# Altium PCB Flyback Converter.PcbDoc
Units mil, origin at the board's own origin, x right, y up, seen from the top; angles counter-clockwise.
Board outline 4900.03 x 2810.03 mil, 2 copper layers (Top Layer, Bottom Layer); 53 components, 29 nets, 118 pads, 10 vias.
Unrouted connection lines stored in the file: 9.
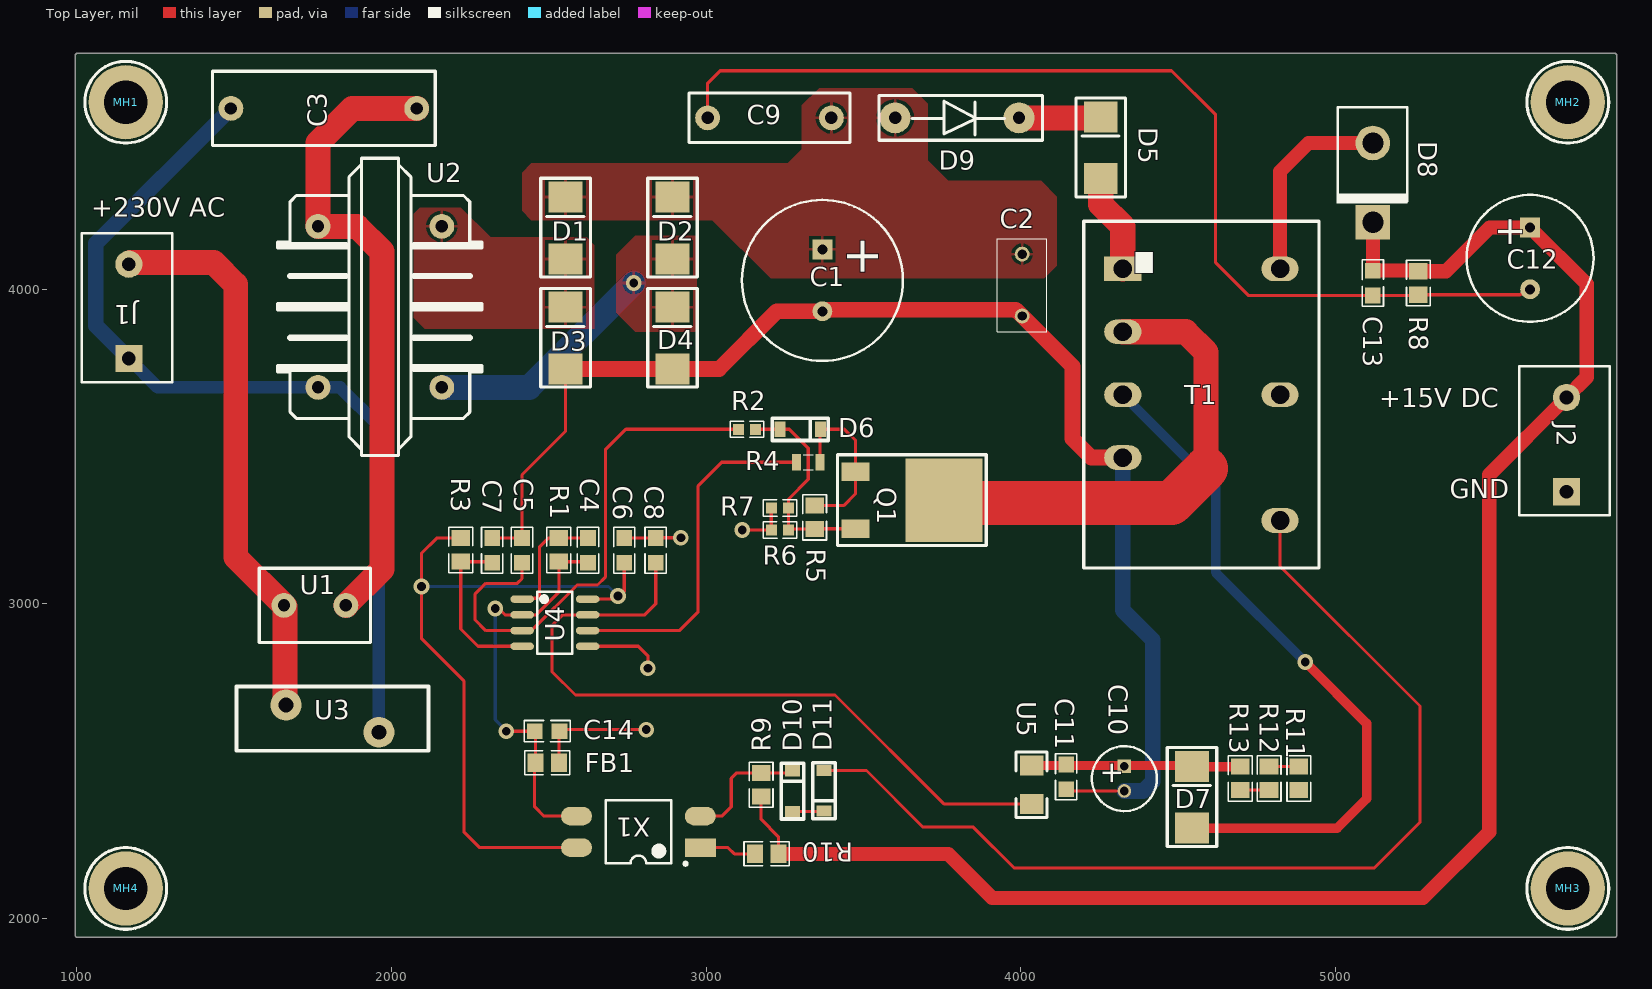
[diagram p0: Top Layer view]
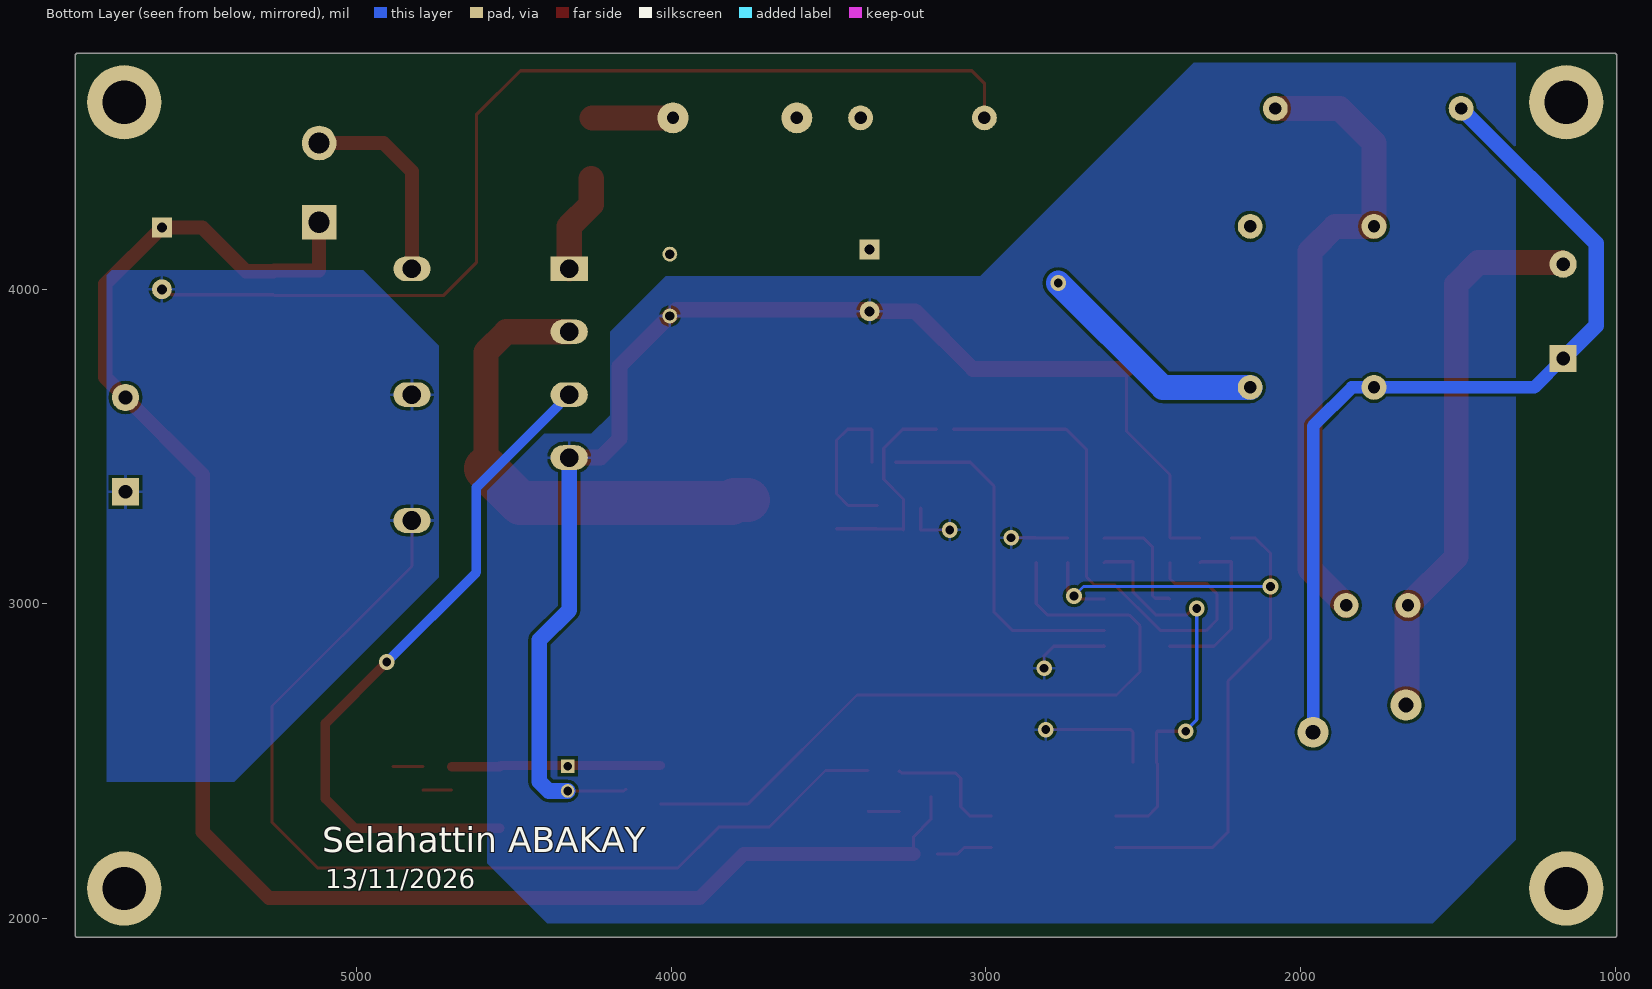
[diagram p1: Bottom Layer view, seen from below]
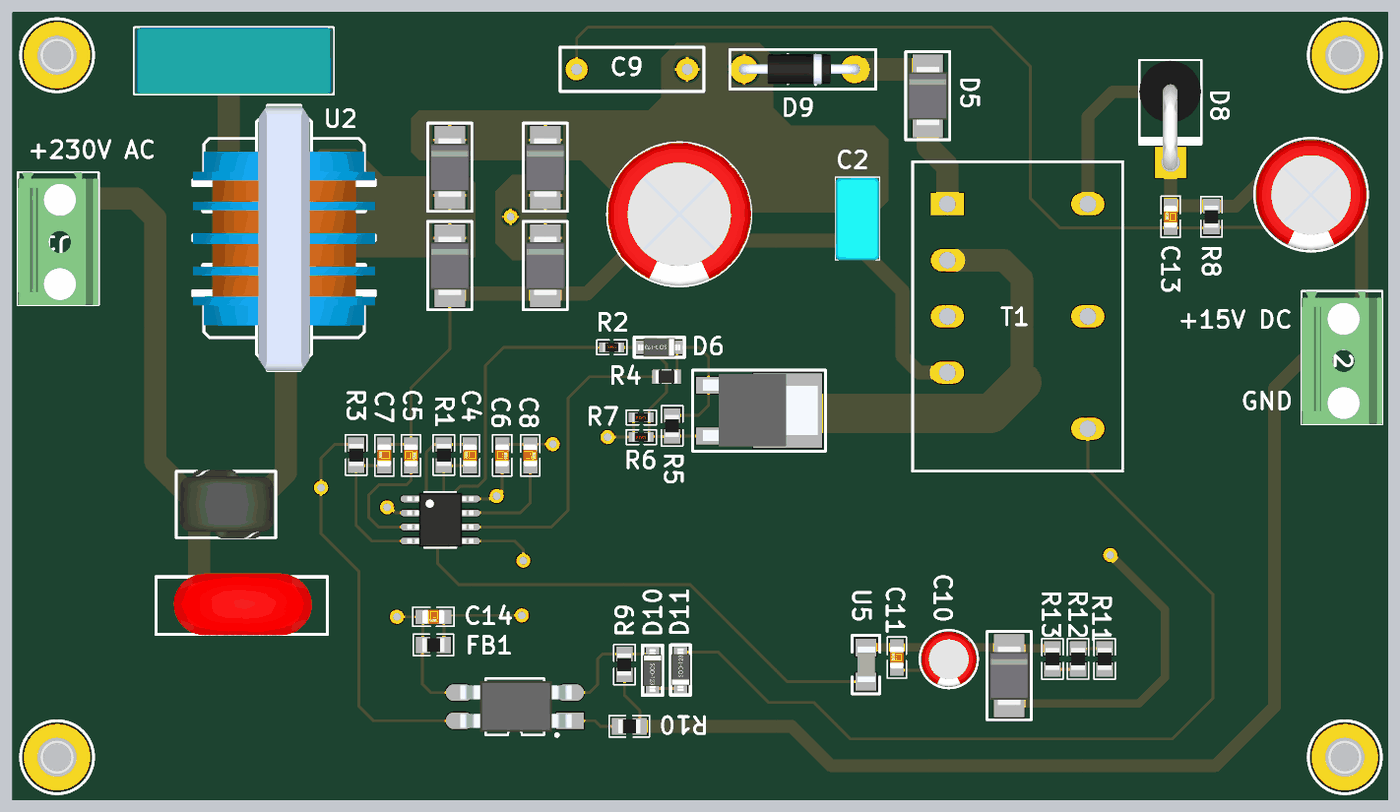
[diagram p2: 3D render of the assembled board from above, using the file's embedded part models]

## Layer stack, top to bottom
Top Solder: solder mask 0.4, Solder Resist, Dk 3.5
Top Layer: signal copper 1.4
Dielectric 1: dielectric 12.6, FR-4, Dk 4.8
Bottom Layer: signal copper 1.4
Bottom Solder: solder mask 0.4, Solder Resist, Dk 3.5

## Board outline
1000,1939.98 cw(c1000,1945) 994.99,1945 994.99,4745 cw(c1000,4745) 1000,4750.02 5890,4750.02 cw(c5890,4745) 5895.01,4745 5895.02,1945 cw(c5890,1945) 5890,1939.98

## Design rules (kind name [scope] priority, off if disabled: settings)
Clearance [All] p1: gap=10 ignorepadtopadclearanceinfootprint=TRUE
PolygonConnect [All] p1: connectstyle=Relief reliefconductorwidth=10 reliefentries=4 polygonreliefangle="90 Angle" airgapwidth=10
RoutingVias [All] p1: holewidth=28 width=50 viastyle="Through Hole" minholewidth=28 minwidth=10 maxholewidth=100 maxwidth=2000
SolderMaskExpansion [All] p1: expansion=4 istentingtop=FALSE
Width [All] p1: maxlimit=100 minlimit=10 preferedwidth=10
30 further rules are at their usual default settings.

## Components (designator, comment, footprint, x,y, rotation, side; value= is the part's Value field where it differs from the comment)
C1 "22uF 400V" "22uF 400V" 2828.39,4426.93 r270 top
C2 "100nF 1kV" RCE7U2J333J5B1H03B 4005,3915 r90 top
C3 "150nF 305VAC X2" "CFR F15 L18 B6 H12" 1489.45,4575 r0 top
C4 "0.1uF" CAP_0805 2625,3170 r90 top
C5 "22pF" CAP_0805 2415,3170.01 r270 top
C6 "0.1uF" CAP_0805 2740,3170 r270 top
C7 "2.2nF" CAP_0805 2320,3170 r90 top
C8 "1uF" CAP_0805 2840,3170 r270 top
C9 "2.2nF Y2" 4x13x9 3005,4545 r0 top
C10 "47uF 25V" CAPPRD200W50D525H1250 4330,2483.74 r270 top
C11 "0.1uF" CAP_0805 4145,2450 r90 top
C12 "470uF 35V" CAPPRD500W60D1025H1750 5620,4196.85 r270 top
C13 "1uF" CAP_0805 5120,4020 r90 top
C14 "0.1uF" CAP_0805 2495,2595 r180 top
D1 "ES2D" DO-214AA(SMB) 2553.31,4195 r90 top
D2 "ES2D" DO-214AA(SMB) 2893.31,4195 r90 top
D3 "ES2D" DO-214AA(SMB) 2553.31,3845 r90 top
D4 "ES2D" DO-214AA(SMB) 2893.31,3845 r90 top
D5 "1N4007FLTR" DO-214AA(SMB) 4255,4450 r90 top
D6 "Zener" SOD-123 3235,3555 r0 top
D7 "ES2D" DO-214AA(SMB) 4545,2385 r90 top
D8 "MUR460RLG" "DO-201AD -Dik" 5118.23,4465.59 r270 top
D9 "P6KE200A" DO-15((DO-204AC) 3601.3,4545 r0 top
D10 "Zener" SOD-123 3275,2340 r90 top
D11 "Zener" SOD-123 3375,2470 r270 top
FB1 "1K" IND_0805 2495,2495 r0 top
J1 "Header 2pin 7.62mm Vidalı" "Header 2 Pin 7.62mm Vidalı" 1159.37,3928.82 r90 top
J2 "Header 2pin 7.62mm Vidalı" "Header 2 Pin 7.62mm Vidalı" 5730,3505 r90 top
MH1 "Mounting Hole" MOUNTING 1155,4595 r0 top
MH2 "Mounting Hole" MOUNTING 5740,4595 r0 top
MH3 "Mounting Hole" MOUNTING 5740,2095 r0 top
MH4 "Mounting Hole" MOUNTING 1155,2095 r0 top
Q1 "NTD360N80S3Z" "DPAK IGBT" 3756.3,3329.45 r270 top
R1 "100K" RES_0805 2531.98,3171.38 r270 top
R2 "1K" RES_0603 3130,3555 r180 top
R3 "3.3K" RES_0805 2220,3171.38 r270 top
R4 "Resistor" Resistor_Smd_M2012_I0805 3325,3450 r0 top value=22R
R5 "4.7K" RES_0805 3345,3275 r270 top
R6 "2.2R" RES_0603 3235,3235 r0 top
R7 "2.2R" RES_0603 3235,3305 r0 top
R8 "2.2K" RES_0805 5265,4020 r270 top
R9 "4.7K" RES_0805 3175,2425 r270 top
R10 "510R" RES_0805 3192.6,2205 r180 top
R11 "100K" RES_0805 4885,2445 r270 top
R12 "100K" RES_0805 4790,2445 r90 top
R13 "100K" RES_0805 4698.98,2445 r270 top
T1 "SMPS Tr" "SMPS Tr3" 4325,4065 r0 top
U1 "NTC" "NTC B57153S0100" 1655.15,2995 r0 top
U2 "39mH 0.7A" "EMC SMPS TDK" 2133.3,3618.19 r90 top
U3 "S10K320" Varistor630V 1960,2635 r180 top
U4 "UC3844" SOIC-OA8_L 2520,2940 r0 top
U5 "80R 100MHz" "1206 Bead" 4035,2425 r270 top
X1 "PC81710NIP1B" "PC817 SMD" 2785,2275 r180 top

## Footprints (in the part's own frame and the unit in brackets; to place one, negate y for a bottom-side part, rotate by r counter-clockwise, add the part's x,y. Pads: shape width x height; smd on the part's side, far side on the other; paste and mask are expansions set on the pad)
4x13x9 [mm] "4x13x9"
  round 2 hole 1: 1(0,0) 2(10,0)
  silkscreen extent -1.5,-2 11.5,2, body extent -1.5,-2 11.5,2, height 9
"22uF 400V" [mm] "400AX22MEFC12.5X16"
  rect 1.6x1.6 hole 0.8: 1(7.622,13.757)
  round 1.6 hole 0.8: 2(12.622,13.757)
  silkscreen extent 3.62,7.26 16.62,20.26, body extent 3.61,7.27 16.6,20.27, height 20.31
"1206 Bead" [mm] "1206 Bead"
  rect 1.6x1.9 smd: 1(-1.55,0) 2(1.55,0)
  silkscreen extent -2.65,-1.25 2.65,1.25, body extent -1.6,-0.77 1.6,0.83, height 1.3
CAP_0805 [mil] "Ceramic Capacitor"
  rect 50x50 smd mask+3: 1(-39.37,0) 2(39.37,0)
  silkscreen extent -73,-34 73,34, body extent -39,-25 39,25, height 31
CAPPRD200W50D525H1250 [mm]
  rect 1.1x1.1 hole 0.7: 1(0,0)
  round 1.1 hole 0.7: 2(2,0)
  silkscreen extent -1.62,-2.62 3.62,2.63, body extent -1.48,-2.5 3.51,2.5, height 11.31
CAPPRD500W60D1025H1750 [mm]
  rect 1.6x1.6 hole 0.8: 1(0,0)
  round 1.6 hole 0.8: 2(5,0)
  silkscreen extent -2.62,-5.13 7.62,5.13, body extent -2.49,-5 7.5,5, height 20.26
"CFR F15 L18 B6 H12" [mm]
  round 2 hole 1: 1(0,0) 2(15,0)
  silkscreen extent -1.5,-3 16.5,3, body extent -1.5,-3 16.5,3, height 12
DO-15((DO-204AC) [mm] "Diode, Axial; Body 9.5 x 5.6 mm (LxDia. max), Lead Dia. 1.32 mm (max)"
  round 2.5 hole 1: 1(0,0) 2(10,0)
  silkscreen extent -1.3,-1.8 11.9,1.8, body extent -0.45,-1.34 10.41,1.39, height 2.84
"DO-201AD -Dik" [mm] "Diode, Axial; Body 9.5 x 5.6 mm (LxDia. max), Lead Dia. 1.32 mm (max)"
  round 2.8 hole 1.7: 1(0.015,0.045)
  rect 2.8x2.8 hole 1.7: 2(6.412,0.045)
  silkscreen extent -2.86,-2.88 4.89,2.86, body extent -2.8,-2.8 7.09,2.8, height 15.69
DO-214AA(SMB) [mm]
  rect 2.5x2.743 smd: 1(-2.5,0) 2(2.5,0)
  silkscreen extent -3.97,-2 4.02,2, body extent -2.7,-1.8 2.7,1.8, height 2.27
"DPAK IGBT" [mm]
  rect 1.524x2.28 smd: 1(-2.3,-7.145) 3(2.3,-7.145)
  rect 6.74x6.23 smd: 2(0,0)
  silkscreen extent -3.67,-8.59 3.67,3.41, body extent -3.3,-7.67 3.24,2.72, height 2.49
"EMC SMPS TDK" [mm] "B82732R13MM"
  round 2 hole 1: 1(1.778,9.322) 2(14.778,9.322) 3(14.778,-0.678) 4(1.778,-0.678)
  silkscreen extent -3.72,-3.93 20.28,12.57, body extent -3.77,-3.93 20.23,12.57, height 23.6
"Header 2 Pin 7.62mm Vidalı" [mm]
  rect 2.2x2.2 hole 1.1: 1(-3.78,-0.143)
  round 2.2 hole 1.1: 2(3.84,-0.143)
  silkscreen extent -5.69,-3.64 6.34,3.66, body extent -5.69,-3.64 6.34,3.66, height 9.2
IND_0805 [mm] "Ferrite Bead"
  rect 1.3x1.5 smd mask+0.076: 1(0.95,0) 2(-0.95,0)
  silkscreen extent -1.83,-0.97 1.83,0.97, body extent -1,-0.63 1,0.62, height 0.5
MOUNTING [mm] "MH"
  round 6 hole 3.5: 1(0,0)
  silkscreen extent -3.3,-3.3 3.3,3.3, body extent -3,-2.75 3,2.75, height 4.24
"NTC B57153S0100" [mm] "NTC B57153S0100"
  round 2 hole 1: 1(0.076,0) 2(5.076,0)
  silkscreen extent -1.92,-3 7.08,3, body extent -1.6,-3.07 6.89,3.13, height 13
"PC817 SMD" [mm] "DIP; 4 Leads; Row Spacing 7.62 mm; Pitch 2.54 mm"
  rect 2.5x1.5 smd: 1(-5,1.27)
  oval 2.5x1.5 smd: 2(-5,-1.27) 3(5,-1.27) 4(5,1.27)
  silkscreen extent -3.94,-2.55 2.65,2.69, body extent -5.13,-2.31 4.92,2.29, height 3.88
RCE7U2J333J5B1H03B [mm]
  round 1.2 hole 0.75: 1(0,0) 2(5,0)
  silkscreen extent -1.25,-2 6.25,2, body extent -1.29,-1.99 6.21,2.01, height 9.75
RES_0603 [mil] "CASE: 0603"
  rect 35x35 smd mask+3: 1(-27.5,0) 2(27.5,0)
  silkscreen extent -53,-26 54,26, body extent -31,-16 31,16, height 18
RES_0805 [mm] "Resister"
  rect 1.3x1.5 smd mask+0.076: 1(0.95,0) 2(-0.95,0)
  silkscreen extent -1.83,-0.97 1.83,0.97, body extent -1,-0.63 1,0.62, height 0.5
Resistor_Smd_M2012_I0805 [mm] "Resistor_Smd_M2012_I0805"
  rect 0.7x1.3 smd mask+0.05: 1(-0.95,0) 2(0.95,0)
  silkscreen extent -0.4,-0.6 0.4,0.6, body extent -1,-0.61 1,0.61, height 0.6
"SMPS Tr3" [mm] "SMPS Tr3"
  rect 3x2 hole 1.5: 1(0,0)
  oval 3x2 hole 1.5: 2(0,-5.08) 3(0,-10.16) 4(0,-15.24) 8(12.7,-20.32) 8(12.7,-10.16) 10(12.7,0)
  silkscreen extent -3.15,-24.16 15.85,3.84
SOD-123 [mm] "SOD-123"
  rect 0.91x1.22 smd: 1(0,0) 2(3.275,0)
  silkscreen extent -0.62,-0.9 3.9,0.9, body extent -0.3,-0.85 3.55,0.85, height 1.42
SOIC-OA8_L [mm] "SOIC, 8-Leads, Body 4.9x3.9mm, Pitch 1.27mm, IPC High Density"
  oval 1.9x0.6 smd: 1(-2.655,1.905) 2(-2.655,0.635) 3(-2.655,-0.635) 4(-2.655,-1.905) 5(2.629,-1.905) 6(2.629,-0.635) 7(2.629,0.635) 8(2.629,1.905)
  silkscreen extent -1.46,-2.5 1.41,2.5, body extent -2.99,-2.45 3.01,2.45, height 1.75
Varistor630V [mm]
  round 2.5 hole 1.2: 1(0,1.1) 2(7.5,-1.1)
  silkscreen extent -4,-2.6 11.5,2.6, body extent -2.6,-2.9 9.9,2.7, height 16.25

## Part data
C1: library part "C 22uF 400V 270mArms", "400AX22MEFC12.5X16", Manufacturer_Name=AVX, Manufacturer_Part_Number=TPSE107K020R0150, Mouser Part Number=581-TPSE107K020R0150, RS Part Number=1359911P, Allied Price/Stock=http://www.alliedelec.com/avx-tpse107k020r0150/70002020/, Allied_Number=70002020, Datasheet Link=http://datasheets.avx.com/TPS.pdf, Height=4.3mm, Mouser Price/Stock=https://www.mouser.com/Search/Refine.aspx?Keyword=581-TPSE107K020R0150, RS Price/Stock=http://uk.rs-online.com/web/p/products/1359911P
C2: library part "C Seramik 100nF 1kV X7R 5mm", "490-8944-ND", LatestRevisionDate=17-Jul-2002, LatestRevisionNote="Re-released for DXP Platform.", PackageDescription="Radial Cap, Thru-Hole; 2 Leads; 0.3 in Pin Spacing", PackageReference=RAD-0.3, Published=8-Jun-2000, Publisher="Altium Limited"
C3: library part "Cap 150nF 305VAC X2", "1572-1789-ND", Capacitance=150nF, Operating Temperature="-40 to +105degC", Part Number=890273322005CS, Rate of Voltage Rise=340V/us, Rated Voltage=250VDC, Insulation Resistance=30000MOhm, ComponentLink1Description=Manufacturer, ComponentLink1URL=http://www.we-online.de, ComponentLink2Description=Datasheet, ComponentLink2URL=https://katalog.we-online.com/pbs/datasheet/890273322005CS.pdf, Dissipation Factor@1kHz=0.1%, Dissipation Factor@10kHz=0.1%, Dissipation Factor@100kHz=0.26%, Height=11mm, Length=10.5mm, Mounting Technology=THT, Packaging=Carton, Pitch=7.5mm, Published Date="August 2019", Publisher="Wurth Elektronik", Technical Reference=MPPP075154J250DCPP45004, Width=5mm
C4 C14: library part CAP_0.1uF-50V-10%-0805, "0.1µF ±10% 50V Ceramic Capacitor X7R 0805 (2012 Metric)", Alternate Part Number-1=NA, Case/Package=0805, Manufacturer=Samsung, Manufacturer Part Number=CL21B104KBCNNNC, Supplier Part Number-1=0805B104K500CT, Supplier-1=SIRICOM
C5: library part CAP_22PF-50V-5%-0805, "22pF ±5% 50V Ceramic Capacitor C0G, NP0 0805 (2012 Metric)", Alternate Part Number-1=0805CG220J500NT, Case/Package=0805, Manufacturer=Yageo, Manufacturer Part Number=CC0805JRNPO9BN220, Supplier Part Number-1=0805N220J500CT, Supplier-1=SIRICOM
C6 C11: library part CAP_0.1uF-50V-20%-0805, "0.1µF ±20% 50V Ceramic Capacitor X7R 0805 (2012 Metric)", Alternate Part Number-1=NA, Case/Package=0805, Manufacturer="Samsung Electro-Mechanics", Manufacturer Part Number=CL21B104MBCNNNC, Supplier Part Number-1=0805B104K500CT, Supplier-1=SIRICOM
C7: library part CAP_2.2nF-50V-10%-0805, "2200pF ±10% 50V Ceramic Capacitor C0G, NP0 0805 (2012 Metric)", Alternate Part Number-1=NA, Case/Package=0805, Manufacturer=KEMET, Manufacturer Part Number=C0805C222K5GEC7800, Supplier Part Number-1=0805N222J500LT, Supplier-1=SIRICOM
C8 C13: library part CAP_1uF-50V-5%-0805, "1µF ±5% 50V Ceramic Capacitor X7R 0805 (2012 Metric)", Alternate Part Number-1=0805F105M500NT, Case/Package=0805, Manufacturer=Samsung, Manufacturer Part Number=CC0805JKX7R9BB105, Supplier Part Number-1=CL21B105KBFNNNE, Supplier-1=SIRICOM
C9: library part "Cap Y2 2.2nF 300V MKP TDK", "495-4967-1-ND", LatestRevisionDate=17-Jul-2002, LatestRevisionNote="Re-released for DXP Platform.", PackageDescription="Radial Cap, Thru-Hole; 2 Leads; 0.3 in Pin Spacing", PackageReference=RAD-0.3, Published=8-Jun-2000, Publisher="Altium Limited"
C10: library part "C 47uF 25V 250mArms 400mOhm", "1189-1590-1-ND", ComponentLink1Description=http://www.rubycon.co.jp/en/catalog/e_pdfs/aluminum/e_px.pdf
C12: library part "C 470uF 35V 1.76A 28mOhm", "860040475008", LatestRevisionDate=17-Jul-2002, LatestRevisionNote="Re-released for DXP Platform.", PackageDescription="Radial Cap, Thru-Hole; 2 Leads; 0.3 in Pin Spacing", PackageReference=RAD-0.3, Published=8-Jun-2000, Publisher="Altium Limited"
D1 D2 D3 D4 D7: library part "D ES2D", "ES2DFSCT-ND"
D5: library part "D 1N4007 DO-214AA(SMB)", "1655-1N4007FLCT-ND"
D6 D10 D11: library part "Zener SOD-123", "SOD-123", ComponentLink1Description="Manufacturer Link", ComponentLink1URL=http://www.infineon.com/, ComponentLink2Description=Datasheet, ComponentLink2URL=http://www.infineon.com/upload/Document/cmc_upload/documents/009/363/bat17series.pdf, DatasheetVersion=Oct-1999, LatestRevisionDate=29-May-2009, LatestRevisionNote="IPC-7351 Footprint Added.", Note="Pin 2 is not connected and not drawn.", PackageDescription="3-Pin SOT-23 Package 0.95 mm Pitch, 2.5 mm Lead Span", PackageReference=SOT-23, PackageVersion=Sep-2001, Published=21-Mar-2003, Publisher="Altium Limited"
D8: library part "Diyot DO-201AD Dik", "MUR460RLGOSCT-ND"
D9: library part "TVS 200V DO-15", "497-13419-1-ND", ComponentLink1Description="Manufacturer Link", ComponentLink1URL=http://www.infineon.com/, ComponentLink2Description=Datasheet, ComponentLink2URL=http://www.infineon.com/upload/Document/cmc_upload/documents/009/363/bat17series.pdf, DatasheetVersion=Oct-1999, LatestRevisionDate=29-May-2009, LatestRevisionNote="IPC-7351 Footprint Added.", Note="Pin 2 is not connected and not drawn.", PackageDescription="3-Pin SOT-23 Package 0.95 mm Pitch, 2.5 mm Lead Span", PackageReference=SOT-23, PackageVersion=Sep-2001, Published=21-Mar-2003, Publisher="Altium Limited"
FB1: library part FB_1K-100MHZ-1.6A-0805, "1 kOhms @ 100MHz 1 Power Line Ferrite Bead 0805 (2012 Metric) 1.6A", Alternate Part Number-1=NA, Case/Package=0805, Manufacturer=Laird, Manufacturer Part Number=BLM21SP102SH1D, Supplier Part Number-1=ACMS201209A102, Supplier-1=SIRICOM
J1 J2: "691214410002", Operating Temperature="-40 to +105degC", Part Number=691218410002, Rated Current [UL]=30A, Working Voltage [UL]=300VAC, Application="Rising Cage Clamp", Compliance="Lead free / RoHS", ComponentLink1Description=Manufacturer, ComponentLink1URL=http://www.we-online.de, ComponentLink2Description=Datasheet, ComponentLink2URL=https://katalog.we-online.de/em/datasheet/691218410002.pdf, Modularity=Yes, Mounting Technology=THT, Packaging=Box, PCB/Cable/Panel=PCB, Pin Number=2, Pitch=7.62mm, Published Date="October 2019", Publisher="Wurth Elektronik", Type=Horizontal
MH1 MH2 MH3 MH4: library part MH_3.5H_6D, Alternate Part Number-1=NA, Case/Package=TH, Manufacturer=NA, Manufacturer Part Number=NA, Supplier Part Number-1=NA, Supplier-1=NA
Q1: library part "MOSFET DPAK", "DPAK", LatestRevisionDate=17-Jul-2002, LatestRevisionNote="Re-released for DXP Platform.", PackageDescription="TO, Flat Index; 3 In-Line, Axial Leads; Body Dia. 4.6mm; Lead Dia. 0.5 mm (max)", PackageReference=E3, PackageVersion=1995/1996, Published=8-Jun-2000, Publisher="Altium Limited"
R1 R11 R12 R13: library part RES_100K-0.125W-1%-0805, "100 kOhms ±1% 0.125W, 1/8W Chip Resistor 0805 (2012 Metric) Automotive AEC-Q200 Thick Film", Alternate Part Number-1=NA, Case/Package=0805, Manufacturer=Walsin, Manufacturer Part Number=WR08X1003FTL, Supplier Part Number-1=WR08X1003FTL, Supplier-1=SIRICOM
R2: library part RES_1K-0.1W-1%-0603, "1 kOhms ±1% 0.1W, 1/10W Chip Resistor 0603 (1608 Metric) Automotive AEC-Q200 Thick Film", Alternate Part Number-1=0603WAF1001T5E, Case/Package=0603, Manufacturer=Walsin, Manufacturer Part Number=WR06X1001FTL, Supplier Part Number-1=WR06X1001FTL, Supplier-1=SIRICOM
R3: library part RES_3.3K-0.125W-1%-0805, "3.3 kOhms ±1% 0.125W, 1/8W Chip Resistor 0805 (2012 Metric) Thick Film", Alternate Part Number-1=0805W8F3301T5E, Case/Package=0805, Manufacturer=Panasonic, Manufacturer Part Number=1623214-1, Supplier Part Number-1=WR08X3301FTL, Supplier-1=SIRICOM
R4: Operating Temperature, Max=*℃, Package=0805, Component Category=Resistor, Component Type="Fixed Value", ComponentLink1Description=Datasheet, ComponentLink2Description="Supplier Link", Operating Temperature, Min=*℃
R5 R9: library part RES_4.7K-0.125W-1%-0805, "4.7 kOhms ±1% 0.125W, 1/8W Chip Resistor 0805 (2012 Metric) Moisture Resistant Thick Film", Alternate Part Number-1=0805W8F4701T5E, Case/Package=0805, Manufacturer="TE Connectivity", Manufacturer Part Number=RC0805FR-074K7L, Supplier Part Number-1=WR08X4701FTL, Supplier-1=SIRICOM
R6 R7: library part RES_2.2R-0.1W-1%-0603, "2.2 Ohms ±1% 0.1W, 1/10W Chip Resistor 0603 (1608 Metric) Automotive AEC-Q200, Current Sense Thick Film", Alternate Part Number-1=NA, Case/Package=0603, Manufacturer="Panasonic Electronic Components", Manufacturer Part Number=ERJ-3RQF2R2V, Supplier Part Number-1=NA, Supplier-1=SIRICOM
R8: library part RES_2.2K-0.125W-1%-0805, "2.2 kOhms ±1% 0.125W, 1/8W Chip Resistor 0805 (2012 Metric) Thick Film", Alternate Part Number-1=CR0805F82201G, Case/Package=0805, Manufacturer="Stackpole Electronics", Manufacturer Part Number=CRG0805F2K2, Supplier Part Number-1=WR08X2201FTL, Supplier-1=SIRICOM
R10: library part RES_510R-0.125W-1%-0805, "510 Ohms ±1% 0.125W, 1/8W Chip Resistor 0805 (2012 Metric) Thin Film", Alternate Part Number-1=NA, Case/Package=0805, Manufacturer=Yageo, Manufacturer Part Number=RT0805FRE07510RL, Supplier Part Number-1=WR08X5100FTL, Supplier-1=SIRICOM
T1: library part "SMPS Tr EF25", LatestRevisionDate=17-Jul-2002, LatestRevisionNote="Re-released for DXP Platform.", PackageDescription="Transformer; 8 Leads", PackageReference=TRF_8, Published=25-Jan-2001, Publisher="Altium Limited", Sim Note="Enter the turns ratios, Core loss resistance, Magnetising Reactance, Leakage Reactances and Resistances referred to the primary side into the parameter fields."
U1: library part "NTC 10R 2A 8.5mm", "495-2076-ND", LatestRevisionDate=17-Jul-2002, LatestRevisionNote="Re-released for DXP Platform.", PackageDescription="Axial Device, Thru-Hole; 2 Leads; 0.4 in Pin Spacing", PackageReference=AXIAL-0.4, Published=8-Jun-2000, Publisher="Altium Limited"
U2: library part "EMC SMPS TDK 39mH 0.7A", "495-2781-ND"
U3: library part "Varistor S10K320", LatestRevisionDate=17-Jul-2002, LatestRevisionNote="Re-released for DXP Platform.", PackageDescription="Axial Device, Thru-Hole; 2 Leads; 0.4 in Pin Spacing", PackageReference=AXIAL-0.4, Published=8-Jun-2000, Publisher="Altium Limited"
U4: "SOIC8", PackageReference=SOIC-OA8
U5: library part "Bead 1206", "SMD 1206"
X1: library part PC817, "1855-1014-1-ND"

## Via types
v1: diameter 50, hole 28, Top Layer to Bottom Layer, 10 vias

## Nets (pads, with @x,y where several pads share a name; then routed paths per layer and width w, separated by ;. In a path a pad name is that pad's centre, name@x,y a point inside that pad or via, vN(x,y) a via of type N, cw(c..) or ccw(c..) an arc to the next point about the centre after c; other vN are vias at no path point)
+5V: C6.2 R3.2 U4.8 X1.4 | length 2319.9
  Top Layer w10: R3.2 2143.77,3208.77 2095,3160 v1(2095,3055) 2095,2890 2230,2755 2230,2275 2280,2225 X1.4 ; U4.8 2715,3015 2740,3040 C6.2
  Bottom Layer w10: v1(2095,3055) 2690,3055 v1(2720,3025)
+15V: C8.2 U4.7 U5.2 | length 2334
  Top Layer w10: C8.2 2840,3000 2805,2965 U4.7 2545,2965 2510,2930 2510,2785 2585,2710 3410,2710 3756.02,2363.98 U5.2
+15VKontrol: C12.1 C13.2 D8.2 J2.2 R8.2 R9.1 R10.2 | length 5447.5
  Top Layer w10: R9.1 3175,2315 3230,2260 R10.2 ; R8.2@5263.03,4059.37 R8.2
  Top Layer w45: R10.2 3770,2205 3910,2065 5280,2065 5490,2275 5490,3410.55 J2.2 5800,3720.55 5800,4016.85 C12.1 5491.85,4196.85 5352.4,4057.4 R8.2 ; C13.2 R8.2@5263.03,4059.37 ; C13.2 D8.2
EARTH: C1.2 C2.1 C5.1 C6.1 C7.2 C8.1 C10.2 C11.1 C14.1 D3.1 D4.1 FB1.1 R6.1 R7.1 T1.4 U4.5 | length 5196.6
  Top Layer w10: C7.2 C5.1 2415,3410 2553.31,3548.31 D3.1 ; FB1.1 2532.4,2593.03 C14.1 2539.37,2600 v1(2810,2600) ; U4.5@2626.13,2867.61 U4.5 2785,2865 2815,2835 v1(2815,2795) ; C6.1 C8.1 2840.64,3210 v1(2920,3210) ; v1(3115,3235) R6.1 R7.1 ; C1.2 C1.2@3375,3935 ; C11.1 4150.63,2405 C10.2
  Top Layer w50: D3.1 D4.1 3041.57,3746.57 3225,3930 C1.2 ; C1.2@3375,3935 3985,3935 C2.1 4165,3755 4165,3525 4225,3465 T1.4
  Bottom Layer w50: T1.4 4325,2980 4420,2885 4420,2435 4390,2405 C10.2
EMITTER: D6.1 Q1.3 R2.1 R5.1 R6.2 R7.2 | length 692.4
  Top Layer w10: R2.1 D6.1 3265,3555 3325,3495 3325,3395.86 3262.5,3333.36 R7.2 R6.2 3265.1,3237.6 R5.1 3346.31,3238.9 Q1.3
GND: C9.1 C12.2 C13.1 D11.1 J2.1 MH1.1 MH2.1 MH3.1 MH4.1 R8.1 T1.8 | length 6549.1
  Top Layer w10: C9.1 3005,4655 3045,4695 4480,4695 4620,4555 4620,4085 4725,3980 5119.36,3980 C13.1 5263.04,3980.63 R8.1 5588.26,3982.6 5605.66,4000 C12.2 ; D11.1 3510,2470 3690,2290 3850,2290 3980,2160 5125,2160 5270,2305 5270,2675 4825,3120 T1.8@4825,3265
IS: C5.2 R2.2 U4.3 | length 1655.7
  Top Layer w10: C5.2 2415,3080 2400,3065 2300,3065 2265,3030 2265,2950 2300,2915 2444.76,2915 2451.57,2921.81 2451.81,2921.81 2590,3060 2655,3060 2680,3085 2680,3490 2745,3555 R2.2
NetC3_1: C3.1 J1.1 U2.1 U3.1 | length 2873.7
  Bottom Layer w40: J1.1 1256.81,3688.19 U2.1 1836.81,3688.19 1960,3565 U3.1
  Bottom Layer w50: J1.1 1060,3885 1060,4145.55 C3.1
NetC3_2: C3.2 U1.2 U2.2 | length 2034.5
  Top Layer w78.74: U1.2 1970,3110 1970,4120 1890,4200 U2.2 1766.3,4466.3 1875,4575 C3.2
NetC4_2: C4.2 R1.2 U4.1 | length 380.8
  Top Layer w10: U4.1 2418.09,3017.61 2462.61,3017.61 2470,3025 2470,3180 2498.77,3208.77 R1.2 2624.4,3208.77 C4.2
NetC7_1: C7.1 R3.1 U4.4 | length 533.6
  Top Layer w10: C7.1 2316.66,3133.97 R3.1 2220,2920 2275,2865 U4.4
NetC10_1: C10.1 C11.2 D7.2 R13.2 U5.1 | length 665.5
  Top Layer w10: D7.2@4542.4,2486.02 D7.2 D7.2@4546.03,2482.4
  Top Layer w30: U5.1 D7.2@4542.4,2486.02 ; D7.2@4546.03,2482.4 R13.2
NetD1_1: D1.1 D3.2 U2.3
NetD2_1: D2.1 D4.2 U2.4 | length 747.4
  Bottom Layer w78.74: U2.4 2438.19,3688.19 v1(2770,4020)
NetD5_1: D5.1 T1.1 | length 315.6
  Top Layer w80: D5.1 4255,4270 4325,4200 T1.1
NetD5_2: D5.2 D9.2 | length 261.4
  Top Layer w10: D5.2@4251.57,4545 D5.2
  Top Layer w80: D9.2 D5.2@4251.57,4545
NetD6_2: D6.2 Q1.1 R4.2 R5.2 | length 546.8
  Top Layer w10: R5.2 3437.4,3312.4 3475,3350 3475,3520 3440,3555 D6.2 3362.4,3553.46 R4.2
NetD7_1: D7.1 T1.3 | length 2200.3
  Top Layer w30: D7.1 5006.57,2286.57 5100,2380 5100,2620 v1(4905,2815)
  Bottom Layer w10: T1.3 4326.08,3665 4357.84,3633.25 T1.3@4357.84,3632.16
  Bottom Layer w30: T1.3@4357.84,3632.16 4620,3370 4620,3100 v1(4905,2815)
NetD8_1: D8.1 T1.10 | length 642.3
  Top Layer w45: T1.10 4825,4375 4915,4465 D8.1
NetD10_1: D10.1 D11.2 | length 100.4
  Top Layer w10: D10.1 3373.94,2340 D11.2
NetD10_2: D10.2 R9.2 X1.2 | length 407.7
  Top Layer w10: X1.2 3050,2325 3080,2355 3080,2445 3097.4,2462.4 R9.2 3268.46,2462.4 D10.2 D10.2@3276.54,2467.4
NetJ1_2: J1.2 U1.1 U3.2 | length 1773.9
  Top Layer w10: J1.2 J1.2@1170,4085 ; U1.1 U1.1@1661.44,2991.71 ; U3.2@1661.44,2681.59 U3.2
  Top Layer w78.74: J1.2@1170,4085 1435,4085 1505,4015 1505,3148.15 U1.1 ; U3.2@1661.44,2681.59 U1.1@1661.44,2991.71
NetQ1_2: Q1.2 T1.2 | length 1545.1
  Top Layer w80: T1.2 4525,3865 4590,3800 4590,3430
  Top Layer w140: Q1.2 3799.49,3329.45 3808.94,3320 4480,3320 4590,3430
NetR10_1: R10.1 X1.1 | length 181.6
  Top Layer w10: X1.1 3070,2225 3090,2205 R10.1
NetR11_2: R11.2 R12.1 | length 95
  Top Layer w10: R12.1 R11.2
NetR12_2: R12.2 R13.1 | length 91
  Top Layer w10: R13.1 R12.2
PWM: R4.1 U4.6 | length 1120
  Top Layer w10: U4.6 2915,2915 2975,2975 2975,3375 3050,3450 R4.1
VBUS: C1.1 C2.2 C9.2 D1.2 D2.2 D9.1 R11.1 | length 5.2
  Top Layer w10: C1.1@3366.3,4130.55 C1.1
Vfb: C4.1 C14.2 FB1.2 R1.1 U4.2 X1.3 | length 1314.1
  Top Layer w10: v1(2330,2985) 2340.82,2985 2360.82,2965 U4.2 2460,2965 2531.98,3036.98 R1.1 2621.66,3133.97 C4.1 ; v1(2365,2595) C14.2 ; C14.2 2457.6,2593.02 FB1.2 2455,2492.4 2455,2355 2485,2325 X1.3
  Bottom Layer w10: v1(2330,2985) 2330,2631.88 2365,2596.88 v1(2365,2595)

## Polygon pours and split planes (outlines as drawn)
VBUS on Top Layer "VBUS_L01_P006" (solid, pour order 6): 3020,4220 3205,4035 4075,4035 4115,4075 4115,4295 4065,4345 3770,4345 3705,4410 3705,4590 3655,4640 3360,4640 3305,4585 3305,4445 3260,4400 2445,4400 2415,4370 2415,4250 2445,4220
NetD1_1 on Top Layer "NETD1_1_L01_P004" (solid, pour order 4): 2645,3875 2645,4140 2620,4165 2315,4165 2220,4260 2090,4260 2070,4240 2070,3910 2105,3875
NetD2_1 on Top Layer "NETD2_1_L01_P001" (solid, pour order 1): 2970,4170 2970,3870 2965,3865 2775,3865 2715,3925 2715,4110 2775,4170
GND on Bottom Layer "GND_L02_P009" (solid, pour order 9): 4740,3820 4740,3085 5390,2435 5795,2435 5795,4045 5780,4060 4980,4060
EARTH on Bottom Layer "EARTH_L02_P008" (solid, pour order 8): 1315,4720 2340,4720 3018.83,4041.17 4018.83,4041.17 4195,3865 4195,3600 4255,3540 4405,3540 4585,3360 4585,2175 4395,1985 1580,1985 1315,2250

## Silkscreen, mask and mechanical layers (free items; w line width, h text height)
Top Overlay:
  text "+230V AC" at 1045,4230 h60
  text "+15V DC" at 5140,3625 h60
  text "GND" at 5365,3335 h60
Bottom Overlay:
  text "Selahattin ABAKAY" at 5110,2210 h80
  text "13/11/2026" at 5100,2095 h60
Mechanical 13:
  lines w10: 1000,1945 1000,4745 5890,4745 5890,1945 1000,1945

## Text inside footprints (layer, text, board x,y; h text height)
C1: Top Overlay "+" at 3411.06,4171.02 h196.85 r270
C10: Top Overlay "+" at 4238,2501.74 h118.11 r270
C12: Top Overlay "+" at 5488,4235.85 h157.48 r270